# Altium PCB PCB2.PcbDoc (part 3 of 3)
Units mm, origin at the board's own origin, x right, y up, seen from the top; angles counter-clockwise.
Board outline 30 x 45 mm, 4 copper layers (L1 (SIG), L2 (GND), L3 (GND), L4 (SIG+PWR)), stack 0.602 mm thick; 68 components, 50 nets, 259 pads, 113 vias.
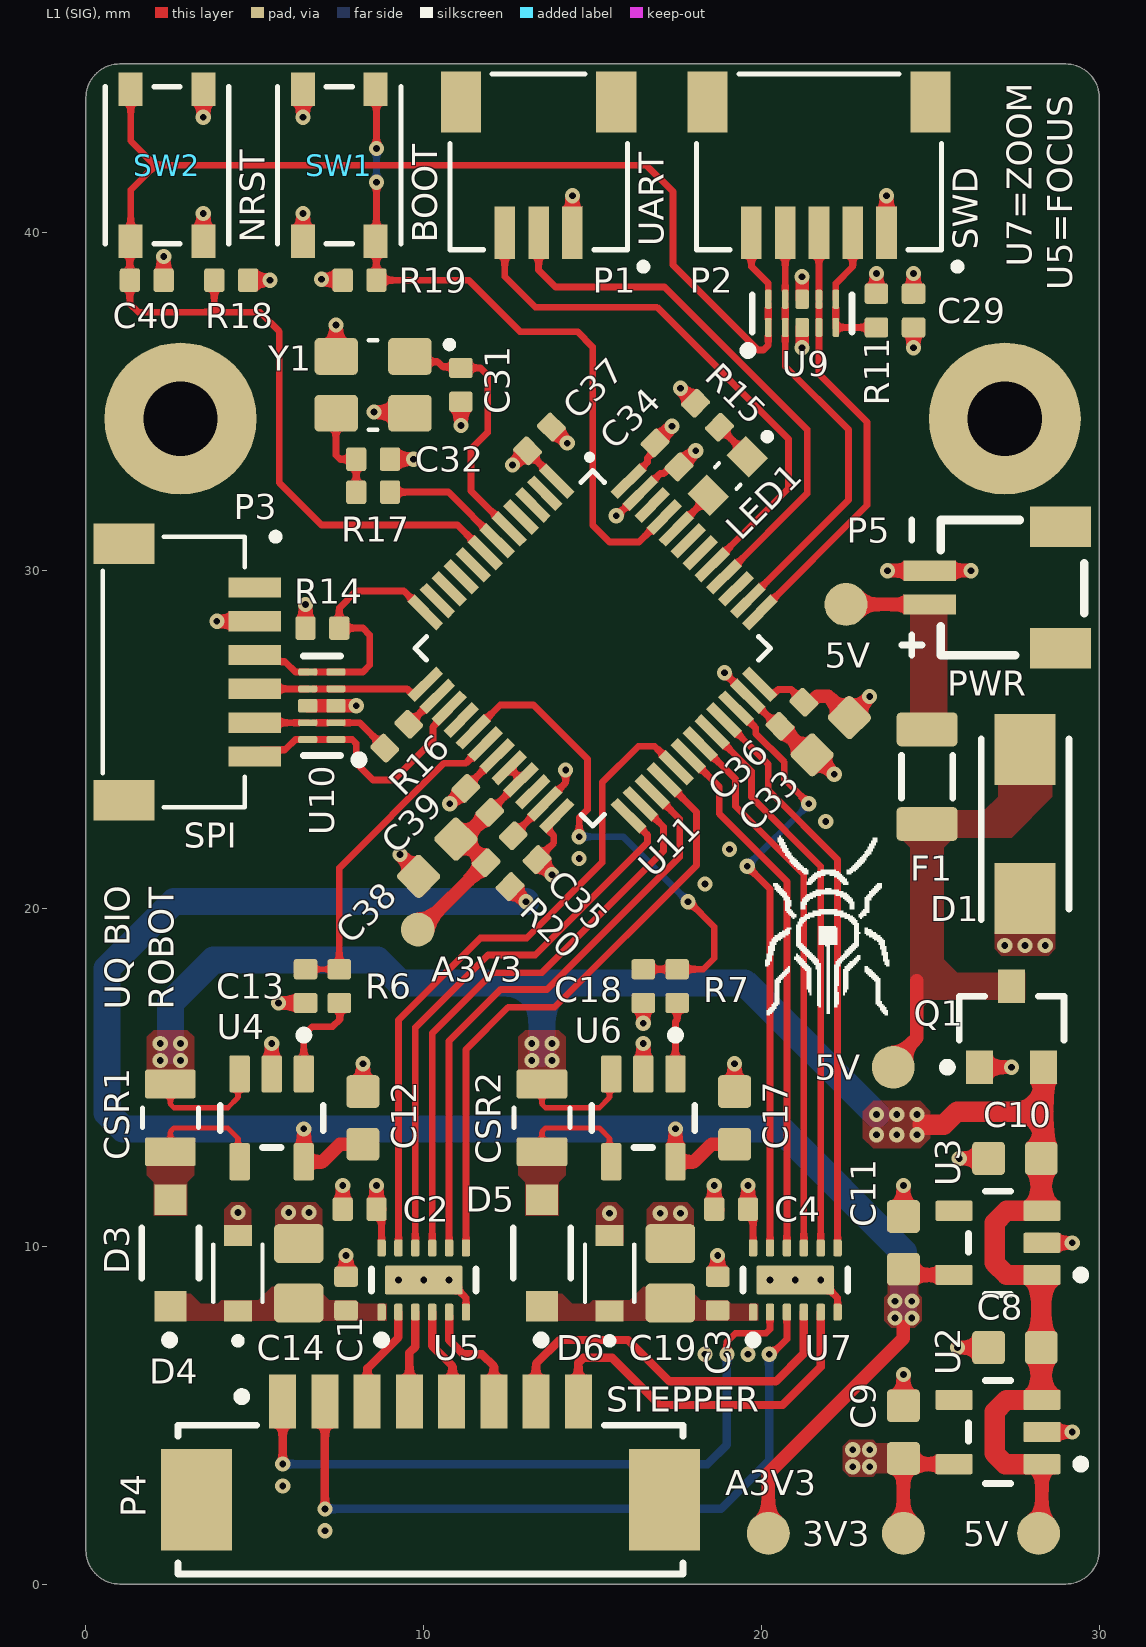
[diagram p0: L1 (SIG) view]

## Part data (continued)
SW1 SW2: library part PTS810SJM250SMTRLFS, "Switch Tactile N.O. SPST Button J-Bend 0.05A 16V 150000Cycles 1.569N SMD T/R", Case/Package=SMD/SMT, Color=Black, Contact Current Rating=50mA, Contact Resistance=500mΩ, Insulation Resistance=100MΩ, Manufacturer="C&K Components", Max Operating Temperature=85°C, Max Voltage Rating (DC)=16V, Min Operating Temperature=-40°C, Operating Force=1.57N, Actuator Length=711.2µm, Category="Tactile Switches", ComponentLink1Description=https://datasheet.octopart.com:443/PTS810SJM250SMTRLFS-C%26K-Components-datasheet-180017475.pdf?src-supplier=IHS, ComponentLink1URL=https://datasheet.octopart.com:443/PTS810SJM250SMTRLFS-C%26K-Components-datasheet-180017475.pdf?src-supplier=IHS, ComponentLink2Description=https://datasheet.octopart.com:443/PTS810SJM250SMTRLFS-C%26K-Components-datasheet-67873722.pdf?src-supplier=Upverter, ComponentLink2URL=https://datasheet.octopart.com:443/PTS810SJM250SMTRLFS-C%26K-Components-datasheet-67873722.pdf?src-supplier=Upverter, ComponentLink3Description=https://datasheet.octopart.com:443/PTS810-SJM-250-SMTR-LFS-C%26K-Components-datasheet-41562126.pdf?src-supplier=Upverter, ComponentLink3URL=https://datasheet.octopart.com:443/PTS810-SJM-250-SMTR-LFS-C%26K-Components-datasheet-41562126.pdf?src-supplier=Upverter, ComponentLink4Description=https://datasheet.octopart.com:443/PTS810SJM250SMTR-LFS-C%26K-Components-datasheet-181955281.pdf?src-supplier=Farnell, ComponentLink4URL=https://datasheet.octopart.com:443/PTS810SJM250SMTR-LFS-C%26K-Components-datasheet-181955281.pdf?src-supplier=Farnell, ComponentLink5Description=https://datasheet.octopart.com:443/PTS810SJM250SMTRLFS-C%26K-Components-datasheet-134606748.pdf?src-supplier=TME, ComponentLink5URL=https://datasheet.octopart.com:443/PTS810SJM250SMTRLFS-C%26K-Components-datasheet-134606748.pdf?src-supplier=TME, ComponentLink6Description=https://datasheet.octopart.com:443/PTS810-SJM-250-SMTR-LFS-C%26K-Components-datasheet-151508687.pdf?src-supplier=TME, ComponentLink6URL=https://datasheet.octopart.com:443/PTS810-SJM-250-SMTR-LFS-C%26K-Components-datasheet-151508687.pdf?src-supplier=TME, ComponentLink7Description=http://sigma.octopart.com:80/reach_statement/ITT-company-18.pdf?src-supplier=Compliance+Statements, ComponentLink7URL=http://sigma.octopart.com:80/reach_statement/ITT-company-18.pdf?src-supplier=Compliance+Statements, Contact Plating=Silver, Country of Origin="Mainland China", Current Rating=50mA, Depth=4.6mm, Electrical Life=150kcycles, Export Control Classification Number (ECCN) Code=EAR99, Harmonized Tariff Schedule (HTS) Code=8536.50.90.40, Height=1.8mm, Illumination Type=Non-Illuminated, Introduction Date=2013-03-04, Lead Free="Lead Free", Length=4.2mm, Life (Cycles)=150kcycles, Lifecycle Status=Production, Manufacturer Package Identifier=PTS810SJM250SMTRLFS, Manufacturer Part Number=PTS810SJM250SMTRLFS, Max Current Rating=50mA, Mechanical Life=150kcycles, Mount="Surface Mount", Number of Pins=4, Number of Positions=1, Orientation=Straight, Pricing 1="1=0.58, 10=0.501, 25=0.4672, 100=0.4173, 250=0.38652, 500=0.36488, 1000=0.34488 (USD)", REACH SVHC=Yes, RoHS=Compliant, Stock 1=70955, Supplier 1=DigiKey, Switch Function=Off-Mom, Switch Travel=150µm, Termination=Solder, Throw Configuration=SPST, Voltage Rating (DC)=16V
U2 U3: "300mA ultra-low-noise low-IQ low-dropout (LDO) linear regulator with high PSRR 5-SOT-23 -40 to 125", Case/Package=SOT-23-5, Dropout Voltage=145mV, Manufacturer="Texas Instruments", Manufacturer Lifecycle Status=ACTIVE, Max Junction Temperature (Tj)=125°C, Max Supply Voltage=6V, Min Operating Temperature=-40°C, Min Supply Voltage=1.6V, Nominal Supply Current=6.5µA, Output Current=300mA, Output Voltage=3.3V, Supplier Part Number 1=296-TPS7A2033PDBVRDKR-ND, Accuracy=1.5%, Category="LDO Voltage Regulators", ComponentLink1Description=https://sigma.octopart.com:443/177332311/technical_drawing/Texas-Instruments-TPS7A2033PDBVR.pdf?src-supplier=Texas+Instruments, ComponentLink1URL=https://sigma.octopart.com:443/177332311/technical_drawing/Texas-Instruments-TPS7A2033PDBVR.pdf?src-supplier=Texas+Instruments, ComponentLink2Description=https://octopart.com:443/opatz8j6/c1?t=jI4MJxUHNHWPLUTUjPFE_I4nFT9ogQQS70wFg6iEODFO8LbYHvqBDKPBMlDtEwO4fNGI88ubVwCkCjf0m79oYyvw0lNgXSr_kQlB_nshs-lDL0gpQEt062WpfwVbrY7aMcaNfk_VYcVu1c5ZyMHT8tYLznoJcMs0V3cIKOpV8FkTUbmZxBhaArT7MSQXB5rB175PQ9HeqkODOBcAb5uxQ4pXmdIRVFW0nHjT5bbTxbLCkHYQ6wSbjOTmjpzrmMdRq376bhW5SzS0L0ZYTijf2l1mplZ7KrrI9CUmQvcyMNcVPe6befGlNnr1fDH3Q5Ss6aSm6FD-UpaqOnEuIpR4XaVo6xK0ksEziWk1rzqOuekfSo_fNioOtoDqTgyhaxobMR58zb0N&src-supplier=Texas+Instruments, ComponentLink2URL=https://octopart.com:443/opatz8j6/c1?t=jI4MJxUHNHWPLUTUjPFE_I4nFT9ogQQS70wFg6iEODFO8LbYHvqBDKPBMlDtEwO4fNGI88ubVwCkCjf0m79oYyvw0lNgXSr_kQlB_nshs-lDL0gpQEt062WpfwVbrY7aMcaNfk_VYcVu1c5ZyMHT8tYLznoJcMs0V3cIKOpV8FkTUbmZxBhaArT7MSQXB5rB175PQ9HeqkODOBcAb5uxQ4pXmdIRVFW0nHjT5bbTxbLCkHYQ6wSbjOTmjpzrmMdRq376bhW5SzS0L0ZYTijf2l1mplZ7KrrI9CUmQvcyMNcVPe6befGlNnr1fDH3Q5Ss6aSm6FD-UpaqOnEuIpR4XaVo6xK0ksEziWk1rzqOuekfSo_fNioOtoDqTgyhaxobMR58zb0N&src-supplier=Texas+Instruments, ComponentLink3Description=https://sigma.octopart.com:443/175570406/technical_drawing/Texas-Instruments-TPS7A2033PDBVR.pdf?src-supplier=Texas+Instruments, ComponentLink3URL=https://sigma.octopart.com:443/175570406/technical_drawing/Texas-Instruments-TPS7A2033PDBVR.pdf?src-supplier=Texas+Instruments, ComponentLink4Description=https://sigma.octopart.com:443/169406034/technical_drawing/Texas-Instruments-TPS7A2033PDBVR.pdf?src-supplier=Texas+Instruments, ComponentLink4URL=https://sigma.octopart.com:443/169406034/technical_drawing/Texas-Instruments-TPS7A2033PDBVR.pdf?src-supplier=Texas+Instruments, ComponentLink5Description=https://sigma.octopart.com:443/155939316/technical_drawing/Texas-Instruments-TPS7A2033PDBVR.pdf?src-supplier=Texas+Instruments, ComponentLink5URL=https://sigma.octopart.com:443/155939316/technical_drawing/Texas-Instruments-TPS7A2033PDBVR.pdf?src-supplier=Texas+Instruments, ComponentLink6Description=https://datasheet.octopart.com:443/TPS7A2033PDBVR-Texas-Instruments-datasheet-149070019.pdf?src-supplier=Upverter, ComponentLink6URL=https://datasheet.octopart.com:443/TPS7A2033PDBVR-Texas-Instruments-datasheet-149070019.pdf?src-supplier=Upverter, ComponentLink7Description=https://datasheet.octopart.com:443/TPS7A2033PDBVR-Texas-Instruments-datasheet-164420832.pdf?src-supplier=Augswan, ComponentLink7URL=https://datasheet.octopart.com:443/TPS7A2033PDBVR-Texas-Instruments-datasheet-164420832.pdf?src-supplier=Augswan, ComponentLink8Description=https://datasheet.octopart.com:443/TPS7A2033PDBVR-Texas-Instruments-datasheet-159781690.pdf?src-supplier=LCSC, ComponentLink8URL=https://datasheet.octopart.com:443/TPS7A2033PDBVR-Texas-Instruments-datasheet-159781690.pdf?src-supplier=LCSC, ComponentLink9Description=http://sigma.octopart.com:80/reach_statement/Texas-Instruments-company-64.pdf?src-supplier=Compliance+Statements, ComponentLink9URL=http://sigma.octopart.com:80/reach_statement/Texas-Instruments-company-64.pdf?src-supplier=Compliance+Statements, ComponentLink10Description=http://sigma.octopart.com:80/conflict_mineral_statement/Texas-Instruments-company-63.pdf?src-supplier=Compliance+Statements, ComponentLink10URL=http://sigma.octopart.com:80/conflict_mineral_statement/Texas-Instruments-company-63.pdf?src-supplier=Compliance+Statements, Height=1.45mm, Length=2.9mm, Lifecycle Status=Production, Manufacturer Part Number=TPS7A2033PDBVR, Max Operating Temperature=125°C, Number of Channels=1, Number of Outputs=1, Number of Pins=5, Pricing 1="1=0.33, 10=0.225, 25=0.1992, 100=0.1715, 250=0.15828, 500=0.15028, 1000=0.14369 (USD)", RoHS=Compliant, Stock 1=57995, Supplier 1=DigiKey, Thickness=1.2mm, Width=1.6mm
U4 U6: "ROHS3Compliant e3 INA180 Matte Tin (Sn) op amp amplifier circuit 2.9mm 80muA 26V 350kHz", Ambient Temperature Range High=125°C, Case/Package=SOT-23, Input Bias Current=80µA, Input Offset Voltage (Vos)=100µV, Manufacturer="Texas Instruments", Manufacturer Lifecycle Status=ACTIVE, Max Junction Temperature (Tj)=150°C, Max Supply Voltage=5.5V, Min Operating Temperature=-40°C, Min Supply Voltage=2.7V, Nominal Supply Current=197µA, Supplier Part Number 1=296-47652-1-ND, Bandwidth=350kHz, Category="Amplifiers - Op Amps, Buffer, Instrumentation", ComponentLink1Description=https://sigma.octopart.com:443/177332311/technical_drawing/Texas-Instruments-INA180A1IDBVR.pdf?src-supplier=Texas+Instruments, ComponentLink1URL=https://sigma.octopart.com:443/177332311/technical_drawing/Texas-Instruments-INA180A1IDBVR.pdf?src-supplier=Texas+Instruments, ComponentLink2Description=https://octopart.com:443/opatz8j6/c1?t=USVpXwc3pIVbTVy8h6XuDkkoMGvkb5KD_FqeyE2PNCczB7YTe3Q13Z_T8ujtTn4Gpso-l7jh3l6VtA3vP-Hgq8a9n1cfIPRG-tpgt9UBcaQl0MK5o67hqvQcTaIDIYwSl7JEugdJq0jtVggrhuFBiiJJDgLUBw7G871SvT8UFaWvLuMV28-GBXdYGtfIxjjOnSlCpVbhUW_om3c_pXV3PX12KrIhnnIeCDjhaOM72OKUehH2shrJDmyrmRFLZA1ON-kpg-xfMekIeTPTZvu1kdk-ipxY04WCEpSq6AhyvyePoREOm4PqxzgZUX-SXQfHeLMqAZ0U-EEJvwubD6Cq1rmkHs9VIc9CN0w7gj8JD984MXRoqBAxtRGhZEIaf43rCiTHWg&src-supplier=Texas+Instruments, ComponentLink2URL=https://octopart.com:443/opatz8j6/c1?t=USVpXwc3pIVbTVy8h6XuDkkoMGvkb5KD_FqeyE2PNCczB7YTe3Q13Z_T8ujtTn4Gpso-l7jh3l6VtA3vP-Hgq8a9n1cfIPRG-tpgt9UBcaQl0MK5o67hqvQcTaIDIYwSl7JEugdJq0jtVggrhuFBiiJJDgLUBw7G871SvT8UFaWvLuMV28-GBXdYGtfIxjjOnSlCpVbhUW_om3c_pXV3PX12KrIhnnIeCDjhaOM72OKUehH2shrJDmyrmRFLZA1ON-kpg-xfMekIeTPTZvu1kdk-ipxY04WCEpSq6AhyvyePoREOm4PqxzgZUX-SXQfHeLMqAZ0U-EEJvwubD6Cq1rmkHs9VIc9CN0w7gj8JD984MXRoqBAxtRGhZEIaf43rCiTHWg&src-supplier=Texas+Instruments, ComponentLink3Description=https://sigma.octopart.com:443/175570406/technical_drawing/Texas-Instruments-INA180A1IDBVR.pdf?src-supplier=Texas+Instruments, ComponentLink3URL=https://sigma.octopart.com:443/175570406/technical_drawing/Texas-Instruments-INA180A1IDBVR.pdf?src-supplier=Texas+Instruments, ComponentLink4Description=https://sigma.octopart.com:443/169406034/technical_drawing/Texas-Instruments-INA180A1IDBVR.pdf?src-supplier=Texas+Instruments, ComponentLink4URL=https://sigma.octopart.com:443/169406034/technical_drawing/Texas-Instruments-INA180A1IDBVR.pdf?src-supplier=Texas+Instruments, ComponentLink5Description=https://sigma.octopart.com:443/155939316/technical_drawing/Texas-Instruments-INA180A1IDBVR.pdf?src-supplier=Texas+Instruments, ComponentLink5URL=https://sigma.octopart.com:443/155939316/technical_drawing/Texas-Instruments-INA180A1IDBVR.pdf?src-supplier=Texas+Instruments, ComponentLink6Description=https://sigma.octopart.com:443/102331370/technical_drawing/Texas-Instruments-INA180A1IDBVR.pdf?src-supplier=Texas+Instruments, ComponentLink6URL=https://sigma.octopart.com:443/102331370/technical_drawing/Texas-Instruments-INA180A1IDBVR.pdf?src-supplier=Texas+Instruments, ComponentLink7Description=https://sigma.octopart.com:443/49249325/technical_drawing/Texas-Instruments-INA180A1IDBVR.pdf?src-supplier=Texas+Instruments, ComponentLink7URL=https://sigma.octopart.com:443/49249325/technical_drawing/Texas-Instruments-INA180A1IDBVR.pdf?src-supplier=Texas+Instruments, ComponentLink8Description=https://datasheet.octopart.com:443/INA180A1IDBVR-Texas-Instruments-datasheet-147835637.pdf?src-supplier=SHENGYU+ELECTRONICS, ComponentLink8URL=https://datasheet.octopart.com:443/INA180A1IDBVR-Texas-Instruments-datasheet-147835637.pdf?src-supplier=SHENGYU+ELECTRONICS, ComponentLink9Description=https://datasheet.octopart.com:443/INA180A1IDBVR-Texas-Instruments-datasheet-159598194.pdf?src-supplier=LCSC, ComponentLink9URL=https://datasheet.octopart.com:443/INA180A1IDBVR-Texas-Instruments-datasheet-159598194.pdf?src-supplier=LCSC, ComponentLink10Description=https://datasheet.octopart.com:443/INA180A1IDBVR-Texas-Instruments-datasheet-159115053.pdf?src-supplier=LCSC, ComponentLink10URL=https://datasheet.octopart.com:443/INA180A1IDBVR-Texas-Instruments-datasheet-159115053.pdf?src-supplier=LCSC, ComponentLink11Description=http://sigma.octopart.com:80/reach_statement/Texas-Instruments-company-64.pdf?src-supplier=Compliance+Statements, ComponentLink11URL=http://sigma.octopart.com:80/reach_statement/Texas-Instruments-company-64.pdf?src-supplier=Compliance+Statements, ComponentLink12Description=http://sigma.octopart.com:80/conflict_mineral_statement/Texas-Instruments-company-63.pdf?src-supplier=Compliance+Statements, ComponentLink12URL=http://sigma.octopart.com:80/conflict_mineral_statement/Texas-Instruments-company-63.pdf?src-supplier=Compliance+Statements, Height=1.45mm, Length=2.9mm, Lifecycle Status=Production, Manufacturer Part Number=INA180A1IDBVR, Max Operating Temperature=125°C, Number of Channels=1, Number of Pins=5, Pricing 1="1=0.52, 10=0.363, 25=0.324, 100=0.2815, 250=0.26124, 500=0.24904, 1000=0.23899 (USD)", RoHS=Compliant, Schedule B="8542330000, 8542330000|8542330000|8542330000|8542330000|8542330000", Supplier 1=DigiKey, Thickness=1.2mm, Width=1.6mm
U5 U7: "12-V, 1.5-A dual H-bridge motor driver 12-WSON -40 to 85", Collector Emitter Voltage (VCEO)=11V, Drain to Source Resistance=305mΩ, Manufacturer="Texas Instruments", Manufacturer Lifecycle Status=ACTIVE, Max Collector Current=1.5A, Max Junction Temperature (Tj)=150°C, Max Operating Temperature=85°C, Max Supply Voltage=7V, Min Operating Temperature=-40°C, Min Supply Voltage=2V, Nominal Supply Current=450µA, Supplier Part Number 1=296-30391-1-ND, Switching Frequency=250kHz, Category="Motor Drivers", ComponentLink1Description=https://sigma.octopart.com:443/81678663/technical_drawing/Texas-Instruments-DRV8835DSSR.pdf?src-supplier=Texas+Instruments, ComponentLink1URL=https://sigma.octopart.com:443/81678663/technical_drawing/Texas-Instruments-DRV8835DSSR.pdf?src-supplier=Texas+Instruments, ComponentLink2Description=https://octopart.com:443/opatz8j6/c1?t=yYKeYF_qTZgJqykfbkIe-MyNo-awpiDwQJ1JpZHc4QQmRE2ALxlPI2F5HuxbvxDQJgOwt9AujW2Z3abA8YObzfh8IObdK5EIxXvX-S8nfL3vF03rQCSr4IhvPx36lTDUzRho3FSTerecEi6PUwZQAcfw4biX9dfhX4qJFG4-DvkdYyzF_AXHfcrjW8NYqjtFm1Ig3y5pJIb4XtmcjhG94Ou3GqVr8sF3hx5Ni2mUq8MJhRMvjbwS2P2fKQOZ0GhDVzPGf3Gk655UHMKd4eaVKvQsspbWj7NAZfnUy6KTI0iGS1VjwsOnAAAnyZzeHo6qjg_9VUaOVsM5A2TuwDIAEEDLISKE6EaKfj0-xcuZ4_eWrZcxUU_9i-up4dsoawxXY1pm7Q&src-supplier=Texas+Instruments, ComponentLink2URL=https://octopart.com:443/opatz8j6/c1?t=yYKeYF_qTZgJqykfbkIe-MyNo-awpiDwQJ1JpZHc4QQmRE2ALxlPI2F5HuxbvxDQJgOwt9AujW2Z3abA8YObzfh8IObdK5EIxXvX-S8nfL3vF03rQCSr4IhvPx36lTDUzRho3FSTerecEi6PUwZQAcfw4biX9dfhX4qJFG4-DvkdYyzF_AXHfcrjW8NYqjtFm1Ig3y5pJIb4XtmcjhG94Ou3GqVr8sF3hx5Ni2mUq8MJhRMvjbwS2P2fKQOZ0GhDVzPGf3Gk655UHMKd4eaVKvQsspbWj7NAZfnUy6KTI0iGS1VjwsOnAAAnyZzeHo6qjg_9VUaOVsM5A2TuwDIAEEDLISKE6EaKfj0-xcuZ4_eWrZcxUU_9i-up4dsoawxXY1pm7Q&src-supplier=Texas+Instruments, ComponentLink3Description=https://datasheet.octopart.com:443/DRV8835DSSR-Texas-Instruments-datasheet-15896035.pdf?src-supplier=Texas+Instruments, ComponentLink3URL=https://datasheet.octopart.com:443/DRV8835DSSR-Texas-Instruments-datasheet-15896035.pdf?src-supplier=Texas+Instruments, ComponentLink4Description=https://datasheet.octopart.com:443/DRV8835DSSR-Texas-Instruments-datasheet-10948952.pdf?src-supplier=Texas+Instruments, ComponentLink4URL=https://datasheet.octopart.com:443/DRV8835DSSR-Texas-Instruments-datasheet-10948952.pdf?src-supplier=Texas+Instruments, ComponentLink5Description=https://sigma.octopart.com:443/49250719/technical_drawing/Texas-Instruments-DRV8835DSSR.pdf?src-supplier=Texas+Instruments, ComponentLink5URL=https://sigma.octopart.com:443/49250719/technical_drawing/Texas-Instruments-DRV8835DSSR.pdf?src-supplier=Texas+Instruments, ComponentLink6Description=https://datasheet.octopart.com:443/DRV8835DSSR-Texas-Instruments-datasheet-21773231.pdf?src-supplier=element14+APAC, ComponentLink6URL=https://datasheet.octopart.com:443/DRV8835DSSR-Texas-Instruments-datasheet-21773231.pdf?src-supplier=element14+APAC, ComponentLink7Description=https://datasheet.octopart.com:443/DRV8835DSSR-Texas-Instruments-datasheet-17762361.pdf?src-supplier=element14+APAC, ComponentLink7URL=https://datasheet.octopart.com:443/DRV8835DSSR-Texas-Instruments-datasheet-17762361.pdf?src-supplier=element14+APAC, ComponentLink8Description=https://datasheet.octopart.com:443/DRV8835DSSR-Texas-Instruments-datasheet-11523579.pdf?src-supplier=Upverter, ComponentLink8URL=https://datasheet.octopart.com:443/DRV8835DSSR-Texas-Instruments-datasheet-11523579.pdf?src-supplier=Upverter, ComponentLink9Description=https://datasheet.octopart.com:443/DRV8835DSSR-Texas-Instruments-datasheet-102488860.pdf?src-supplier=Farnell, ComponentLink9URL=https://datasheet.octopart.com:443/DRV8835DSSR-Texas-Instruments-datasheet-102488860.pdf?src-supplier=Farnell, ComponentLink10Description=https://datasheet.octopart.com:443/DRV8835DSSR-Texas-Instruments-datasheet-165803887.pdf?src-supplier=LCSC, ComponentLink10URL=https://datasheet.octopart.com:443/DRV8835DSSR-Texas-Instruments-datasheet-165803887.pdf?src-supplier=LCSC, ComponentLink11Description=https://datasheet.octopart.com:443/DRV8835DSSR-Texas-Instruments-datasheet-159606066.pdf?src-supplier=LCSC, ComponentLink11URL=https://datasheet.octopart.com:443/DRV8835DSSR-Texas-Instruments-datasheet-159606066.pdf?src-supplier=LCSC, ComponentLink12Description=https://datasheet.octopart.com:443/DRV8835DSSR-Texas-Instruments-datasheet-164414299.pdf?src-supplier=SHENGYU+ELECTRONICS, ComponentLink12URL=https://datasheet.octopart.com:443/DRV8835DSSR-Texas-Instruments-datasheet-164414299.pdf?src-supplier=SHENGYU+ELECTRONICS, ComponentLink13Description=https://datasheet.octopart.com:443/DRV8835DSSR-Texas-Instruments-datasheet-62346020.pdf?src-supplier=Newark, ComponentLink13URL=https://datasheet.octopart.com:443/DRV8835DSSR-Texas-Instruments-datasheet-62346020.pdf?src-supplier=Newark, ComponentLink14Description=https://datasheet.octopart.com:443/DRV8835DSSR-Texas-Instruments-datasheet-179109355.pdf?src-supplier=Arrow.cn, ComponentLink14URL=https://datasheet.octopart.com:443/DRV8835DSSR-Texas-Instruments-datasheet-179109355.pdf?src-supplier=Arrow.cn, ComponentLink15Description=http://sigma.octopart.com:80/reach_statement/Texas-Instruments-company-64.pdf?src-supplier=Compliance+Statements, ComponentLink15URL=http://sigma.octopart.com:80/reach_statement/Texas-Instruments-company-64.pdf?src-supplier=Compliance+Statements, ComponentLink16Description=http://sigma.octopart.com:80/conflict_mineral_statement/Texas-Instruments-company-63.pdf?src-supplier=Compliance+Statements, ComponentLink16URL=http://sigma.octopart.com:80/conflict_mineral_statement/Texas-Instruments-company-63.pdf?src-supplier=Compliance+Statements, Height=800µm, Interface=Parallel, Lead Free="Lead Free", Length=2mm, Lifecycle Status=Production, Logic Function=AND, Manufacturer Part Number=DRV8835DSSR, Motor Type=Brushed, Mount="Surface Mount", Number of Outputs=2, Number of Pins=12, Operating Supply Current=1.5A, Output Current=1.5A, Output Voltage=11V, Packaging="Cut Tape", Pricing 1="1=2.19, 10=1.619, 25=1.476, 100=1.3189, 250=1.24396, 500=1.20412 (USD)", Radiation Hardening=No, REACH SVHC=No, RoHS=Compliant, Schedule B="8542390000, 8542390000|8542390000|8542390000|8542390000|8542390000", Stock 1=49571, Supplier 1=DigiKey, Thickness=750µm, Width=3mm
U9 U10: "Tvs Diodes & Esd Suppressors; TPD4E02B04DQAR; Texas Instruments; 3.6 V; 8.8 V; 5.5 V; 6.4 V", Ambient Temperature Range High=125°C, Breakdown Voltage=6.4V, Capacitance=250fF, Clamping Voltage=8.8V, Manufacturer="Texas Instruments", Manufacturer Lifecycle Status=ACTIVE, Min Breakdown Voltage=5.5V, Min Operating Temperature=-40°C, Operating Supply Voltage=3.6V, Peak Pulse Current=2A, Peak Pulse Power=17W, Power Line Protection=No, Supplier Part Number 1=296-43875-1-ND, Category="TVS Diodes", ComponentLink1Description=https://sigma.octopart.com:443/176143083/technical_drawing/Texas-Instruments-TPD4E02B04DQAR.pdf?src-supplier=Texas+Instruments, ComponentLink1URL=https://sigma.octopart.com:443/176143083/technical_drawing/Texas-Instruments-TPD4E02B04DQAR.pdf?src-supplier=Texas+Instruments, ComponentLink2Description=https://octopart.com:443/opatz8j6/c1?t=aoqDSauUwmHle6qTDBhf01J_x3kMb2tNsy6DVVQxBhwMOFfKV8CkZQkeAg7HStYnhO7loO6NCnDu1YOrv9Z2JQczVlylZGWUOsI57_uevt2i4KjUmUJImJtsNsM8TsbJCJLZRzl3c-JHBOFgKjYzm3f4YkU-aqx3v6cxb1C_ME88aw5ttupZPGMLTNgyHtBJBcpA7ouznK1IKJV2UmyETiVI1pi24i54odCN60WXcAZMQqZ4PrsOmgAalftpno53H2KnyzLpeqa1D7K90IVfQHoOcpwRK6PpTcRmz9oJErDp9YFCGvc7QJo0rve7mXR72TJL87rmV4JS1nvPfqc5mZqgKm5dyfH3wfm-8AMgzoYYSqgqwA0y9g-vb7wUQDN8CkBv7YuzpFQ&src-supplier=Texas+Instruments, ComponentLink2URL=https://octopart.com:443/opatz8j6/c1?t=aoqDSauUwmHle6qTDBhf01J_x3kMb2tNsy6DVVQxBhwMOFfKV8CkZQkeAg7HStYnhO7loO6NCnDu1YOrv9Z2JQczVlylZGWUOsI57_uevt2i4KjUmUJImJtsNsM8TsbJCJLZRzl3c-JHBOFgKjYzm3f4YkU-aqx3v6cxb1C_ME88aw5ttupZPGMLTNgyHtBJBcpA7ouznK1IKJV2UmyETiVI1pi24i54odCN60WXcAZMQqZ4PrsOmgAalftpno53H2KnyzLpeqa1D7K90IVfQHoOcpwRK6PpTcRmz9oJErDp9YFCGvc7QJo0rve7mXR72TJL87rmV4JS1nvPfqc5mZqgKm5dyfH3wfm-8AMgzoYYSqgqwA0y9g-vb7wUQDN8CkBv7YuzpFQ&src-supplier=Texas+Instruments, ComponentLink3Description=https://datasheet.octopart.com:443/TPD4E02B04DQAR-Texas-Instruments-datasheet-59814757.pdf?src-supplier=Texas+Instruments, ComponentLink3URL=https://datasheet.octopart.com:443/TPD4E02B04DQAR-Texas-Instruments-datasheet-59814757.pdf?src-supplier=Texas+Instruments, ComponentLink4Description=https://sigma.octopart.com:443/49262242/technical_drawing/Texas-Instruments-TPD4E02B04DQAR.pdf?src-supplier=Texas+Instruments, ComponentLink4URL=https://sigma.octopart.com:443/49262242/technical_drawing/Texas-Instruments-TPD4E02B04DQAR.pdf?src-supplier=Texas+Instruments, ComponentLink5Description=https://datasheet.octopart.com:443/TPD4E02B04DQAR-Texas-Instruments-datasheet-95279696.pdf?src-supplier=Upverter, ComponentLink5URL=https://datasheet.octopart.com:443/TPD4E02B04DQAR-Texas-Instruments-datasheet-95279696.pdf?src-supplier=Upverter, ComponentLink6Description=https://datasheet.octopart.com:443/TPD4E02B04DQAR-Texas-Instruments-datasheet-66617599.pdf?src-supplier=element14+APAC, ComponentLink6URL=https://datasheet.octopart.com:443/TPD4E02B04DQAR-Texas-Instruments-datasheet-66617599.pdf?src-supplier=element14+APAC, ComponentLink7Description=https://datasheet.octopart.com:443/TPD4E02B04DQAR-Texas-Instruments-datasheet-62283090.pdf?src-supplier=Newark, ComponentLink7URL=https://datasheet.octopart.com:443/TPD4E02B04DQAR-Texas-Instruments-datasheet-62283090.pdf?src-supplier=Newark, ComponentLink8Description=https://datasheet.octopart.com:443/TPD4E02B04DQAR-Texas-Instruments-datasheet-164419877.pdf?src-supplier=Augswan, ComponentLink8URL=https://datasheet.octopart.com:443/TPD4E02B04DQAR-Texas-Instruments-datasheet-164419877.pdf?src-supplier=Augswan, ComponentLink9Description=https://datasheet.octopart.com:443/TPD4E02B04DQAR-Texas-Instruments-datasheet-159117911.pdf?src-supplier=LCSC, ComponentLink9URL=https://datasheet.octopart.com:443/TPD4E02B04DQAR-Texas-Instruments-datasheet-159117911.pdf?src-supplier=LCSC, ComponentLink10Description=https://datasheet.octopart.com:443/TPD4E02B04DQAR-Texas-Instruments-datasheet-164847889.pdf?src-supplier=Arrow.cn, ComponentLink10URL=https://datasheet.octopart.com:443/TPD4E02B04DQAR-Texas-Instruments-datasheet-164847889.pdf?src-supplier=Arrow.cn, ComponentLink11Description=https://datasheet.octopart.com:443/TPD4E02B04DQAR-Texas-Instruments-datasheet-137316104.pdf?src-supplier=Future+Electronics, ComponentLink11URL=https://datasheet.octopart.com:443/TPD4E02B04DQAR-Texas-Instruments-datasheet-137316104.pdf?src-supplier=Future+Electronics, ComponentLink12Description=http://sigma.octopart.com:80/reach_statement/Texas-Instruments-company-64.pdf?src-supplier=Compliance+Statements, ComponentLink12URL=http://sigma.octopart.com:80/reach_statement/Texas-Instruments-company-64.pdf?src-supplier=Compliance+Statements, ComponentLink13Description=http://sigma.octopart.com:80/conflict_mineral_statement/Texas-Instruments-company-63.pdf?src-supplier=Compliance+Statements, ComponentLink13URL=http://sigma.octopart.com:80/conflict_mineral_statement/Texas-Instruments-company-63.pdf?src-supplier=Compliance+Statements, Composition=Zener, Direction=Bidirectional, Height=550µm, Interface=Ethernet, Lead Free="Lead Free", Length=2.5mm, Lifecycle Status=Production, Manufacturer Part Number=TPD4E02B04DQAR, Max Operating Temperature=125°C, Mount="Surface Mount", Number of Bidirectional Channels=4, Number of Channels=4, Number of Pins=10, Packaging="Cut Tape", Pricing 1="1=1.11, 10=0.694, 100=0.4535, 500=0.34992, 1000=0.31655 (USD)", REACH SVHC=No, Reverse Standoff Voltage=3.6V, RoHS=Compliant, Schedule B="8541100080, 8541100080|8541100080|8541100080|8541100080|8541100080", Stock 1=7356, Supplier 1=DigiKey, Thickness=500µm, Width=1mm
U11: "Microcontroller 32-Bit ARM Cortex-M4 RISC 32K-Byte Flash 3.3V 48-Pin LQFP", Case/Package=LFQFP, Frequency=170MHz, Manufacturer=STMicroelectronics, Max Frequency=48MHz, Max Operating Temperature=85°C, Max Supply Current=29mA, Max Supply Voltage=3.6V, Min Operating Temperature=-40°C, Min Supply Voltage=1.71V, Nominal Supply Voltage (DC)=3V, ADC Channels (Resolution)="17-Ch 12-Bit", Category=Microcontrollers, China RoHS=Compliant, ComponentLink1Description=https://datasheet.octopart.com:443/STM32G431C6T6-STMicroelectronics-datasheet-159144895.pdf?src-supplier=Newark, ComponentLink1URL=https://datasheet.octopart.com:443/STM32G431C6T6-STMicroelectronics-datasheet-159144895.pdf?src-supplier=Newark, ComponentLink2Description=https://datasheet.octopart.com:443/STM32G431C6T6-STMicroelectronics-datasheet-144618855.pdf?src-supplier=TME, ComponentLink2URL=https://datasheet.octopart.com:443/STM32G431C6T6-STMicroelectronics-datasheet-144618855.pdf?src-supplier=TME, Core Architecture="ARM Cortex-M4", Country of Origin="Mainland China, Taiwan", DAC Channels (Resolution)="4-Ch 12-Bit", EEPROM Memory Size=0B, Export Control Classification Number (ECCN) Code=3A991.A.2, Flash Memory Size=32kB, Harmonized Tariff Schedule (HTS) Code=8542.31.00.25, Height - Seated (Max)=1.6mm, Interface=USB, Introduction Date=2019-10-29, Length=7mm, Lifecycle Status=Production, Manufacturer Part Number=STM32G431C6T6, Memory Type=FLASH, Number of A/D Converters=2, Number of Channels=17, Number of D/A Converters=2, Number of I2C Channels=3, Number of I/Os=5, Number of Interrupts=16, Number of SPI Channels=3, Number of Terminals=48, Number of Timers/Counters=12, Number of USART Channels=3, Peripherals=POR, Pricing 1="1500=2.29 (USD)", RAM Size=32kB, REACH SVHC=Yes, RoHS=Compliant, Schedule B="8542310000, 8542310000|8542310000|8542310000|8542310000|8542310000", Stock 1=1500, Supplier 1="Future Electronics", Supplier Part Number 1=STM32G431C6T6, Terminal Pitch=500µm, Width=7mm
Y1: library part "TSX-3225 24.0000MF15X-AC3", "Crystal 24MHz ±10ppm (Tol) ±15ppm (Stability) 9pF FUND 40Ohm 4-Pin Mini-CSMD T/R", Case/Package=SMD/SMT, ESR (Equivalent Series Resistance)=40Ω, Frequency=24MHz, Frequency Stability=15ppm, Frequency Tolerance=0.001%, Load Capacitance=9pF, Manufacturer=Epson, Max Operating Temperature=85°C, Min Operating Temperature=-40°C, Category=Crystals, China RoHS=Compliant, ComponentLink1Description=https://datasheet.octopart.com:443/TSX-3225-24.0000MF15X-AC3-Epson-datasheet-61114919.pdf?src-supplier=ODG+(Origin+Data+Global), ComponentLink1URL=https://datasheet.octopart.com:443/TSX-3225-24.0000MF15X-AC3-Epson-datasheet-61114919.pdf?src-supplier=ODG+(Origin+Data+Global), ComponentLink2Description=https://datasheet.octopart.com:443/TSX-322524.0000MF15X-AC3-Epson-datasheet-180707711.pdf?src-supplier=IHS, ComponentLink2URL=https://datasheet.octopart.com:443/TSX-322524.0000MF15X-AC3-Epson-datasheet-180707711.pdf?src-supplier=IHS, ComponentLink3Description=https://datasheet.octopart.com:443/TSX-3225-24.0000MF15X-AC3-Epson-datasheet-141944207.pdf?src-supplier=Arrow.cn, ComponentLink3URL=https://datasheet.octopart.com:443/TSX-3225-24.0000MF15X-AC3-Epson-datasheet-141944207.pdf?src-supplier=Arrow.cn, ComponentLink4Description=http://sigma.octopart.com:80/149135495/reach_statement/Epson-TSX-3225-24.0000MF15X-AC3.pdf?src-supplier=Compliance+Statements, ComponentLink4URL=http://sigma.octopart.com:80/149135495/reach_statement/Epson-TSX-3225-24.0000MF15X-AC3.pdf?src-supplier=Compliance+Statements, ComponentLink5Description=http://sigma.octopart.com:80/149135496/rohs_statement/Epson-TSX-3225-24.0000MF15X-AC3.pdf?src-supplier=Compliance+Statements, ComponentLink5URL=http://sigma.octopart.com:80/149135496/rohs_statement/Epson-TSX-3225-24.0000MF15X-AC3.pdf?src-supplier=Compliance+Statements, Height=609.6µm, Lead Free="Lead Free", Length=3.2004mm, Lifecycle Status=Production, Manufacturer Part Number="TSX-3225 24.0000MF15X-AC3", Mount="Surface Mount", Pricing 1="1=0.82, 10=0.714, 25=0.6748, 50=0.647, 100=0.6202 (USD)", REACH SVHC=Yes, RoHS=Compliant, Schedule B="8541600060, 8541600060|8541600060|8541600060|8541600060|8541600060", Series Resistance=40Ω, Stock 1=44842, Supplier 1=DigiKey, Termination=SMD/SMT, Tolerance=0.001%, Weight=15.989131mg, Width=2.4892mm

## Free pads (board coordinates)
  round 4.5 hole 2.2 mask+0.051: 1(2.8,34.5)
  round 4.5 hole 2.2: 2(27.2,34.5)

## Via types
v1: diameter 0.45, hole 0.2, L1 (SIG) to L4 (SIG+PWR), tented both sides, 107 vias
v2: diameter 0.5, hole 0.2, L1 (SIG) to L4 (SIG+PWR), tented bottom, 6 vias

## Nets (pads, with @x,y where several pads share a name; then routed paths per layer and width w, separated by ;. In a path a pad name is that pad's centre, name@x,y a point inside that pad or via, vN(x,y) a via of type N, cw(c..) or ccw(c..) an arc to the next point about the centre after c; other vN are vias at no path point)
+3V3: 3V3.1 C2.2 C4.2 C9.2 C29.2 C33.2 C34.2 C35.2 C36.2 C37.2 R11.1 R14.1 R18.2 SW1.1 SW1.2 U2.5 U5.12 U7.12 U11.1 U11.24 U11.36 U11.48 | length 22.4
  L1 (SIG) w0.2: C2.2@8.7,11.1 8.75,11.05 U5.12 ; C37.2@13.059,33.546 C37.2 13.071,33.532 13.8,32.803 13.8,32.8 13.939,32.661 U11.1 ; C35.2 13.85,21.943 13.85,22.15 13.632,22.368 13.632,22.443 U11.24 ; U11.48 16.623,33.212 16.623,33.333 16.846,33.556 C34.2 C34.2@16.85,33.779 ; v1@17.346,34.275 v1(17.35,34.275) ; C4.2@19.7,11.1 19.75,11.05 U7.12 ; U11.36 20.264,26.325 20.338,26.325 20.494,26.481 20.877,26.481 C36.2
  L1 (SIG) w0.4: R18.2 v1(5.45,38.6) ; SW1.1 v1(6.425,40.575) ; v1(6.425,43.425) 6.425,44.125 6.5,44.2 6.45,44.25 SW1.2 ; R14.1 v1(6.5,29) ; v1(8.6,11.8) 8.6,11.2 C2.2@8.7,11.1 ; v1(12.625,33.125) 12.638,33.125 C37.2@13.059,33.546 ; C35.2 v1(13.8,21) ; C34.2@16.85,33.779 v1@17.346,34.275 ; v1(19.6,11.8) 19.6,11.2 C4.2@19.7,11.1 ; C36.2 21.289,26.068 21.43,26.068 21.642,26.28 21.973,26.28 C33.2 22.602,25.664 23.2,26.263 v1(23.2,26.275) ; R11.1 v1(23.4,38.8) ; 3V3.1 C9.2@24.2,3.55 ; C9.2 24.37,3.55 U2.5 ; C29.2 24.5,38.3 v1(24.5,38.8)
  other v1: 22.7,3.475 23.2,3.475 22.7,3.975 23.2,3.975
+5V: 5V.1@28.2,1.5 C8.2 C10.2 CSR1.2 CSR2.2 Q1.S U2.1 U2.3 U3.1 U3.3 U4.3 U6.3 | length 56.2
  L1 (SIG) w0.15: CSR1.2 2.5,14.2 2.6,14.1 4.2,14.1 4.5,14.4 U4.3@4.5,15.1 ; CSR2.2@13.5,14.8 13.5,14.2 13.6,14.1 15.2,14.1 15.5,14.4 U6.3@15.5,15.1 ; U3.1@28.28,9.13 U3.1
  L1 (SIG) w0.4: 5V.1@28.2,1.5 28.3,1.6 U2.1
  L1 (SIG) w0.6: 24.772,13.6 25.4,13.6 25.785,13.985 28.35,13.985 ; U2.3@28.28,5.47 C8.2 U3.1@28.28,9.13 ; U2.1 27.213,3.55 26.9,3.863 26.9,5.099 27.251,5.45 U2.3 ; U3.1 27.251,9.15 26.9,9.501 26.9,10.699 27.251,11.05 27.9,11.05 U3.3 28.28,11.07 C10.2 C10.2@28.35,12.67 ; C10.2@28.35,12.6 C10.2@28.35,12.67 ; Q1.S 28.35,13.985 ; C10.2@28.35,12.67 28.35,13.985
  L4 (SIG+PWR) w0.8: 2.5,15.8 2.5,17.2 3.775,18.475 8.625,18.475 9.3,17.8 13.5,17.8 ; 13.5,15.7 13.5,17.8 ; v1(23.4,13.9) 19.5,17.8 13.5,17.8
  other v1: 23.4,13.3 24,13.3 24.6,13.3 24,13.9 24.6,13.9 2.2,15.5 2.8,15.5 13.2,15.5 13.8,15.5 2.2,16 2.8,16 13.2,16 13.8,16
+A3V3: A3V3.1@20.2,1.5 C11.2 C12.2 C17.2 R20.1 U3.5 U4.5 U6.5 | length 60.4
  L1 (SIG) w0.4: v1(6.45,13.475) U4.5 7,12.5 7.52,13.02 C12.2 ; R20.1@12.554,20.635 12.578,20.635 13.013,20.2 v1(13.025,20.2) ; v1(17.45,13.475) U6.5 18,12.5 18.52,13.02 C17.2 ; A3V3.1@20.2,1.5 20.2,3.275 24.2,7.275 24.2,7.611 ; C11.2 24.37,9.15 U3.5
  L4 (SIG+PWR) w0.4: 2.475,20.075 2.6,20.2
  L4 (SIG+PWR) w0.8: 2.475,20.075 0.625,18.225 0.625,13.944 1.094,13.475 v1(6.45,13.475) v1(17.45,13.475) 20.55,13.475 24.2,9.825 24.2,8.125 ; 2.6,20.2 12.075,20.2 v1(13.025,20.2)
  other v1: 23.95,7.875 24.45,7.875 23.95,8.375 24.45,8.375
+VCONN: 5V.1@22.5,29 F1.1 P5.2 | length 2.6
  L1 (SIG) w0.15: P5.2@24.6,29 24.7,29.1 24.8,29 P5.2@25.025,29
  L1 (SIG) w0.4: 5V.1@22.5,29 P5.2@24.6,29
+VDDA: A3V3.1@9.825,19.375 C38.2 C39.2 R20.2 U11.20 U11.21 | length 7.1
  L1 (SIG) w0.2: C38.2 11.148,22.052 C38.2@11.159,22.052 ; R20.2@11.8,21.4 11.9,21.4 11.854,21.354 R20.2 ; C39.2@11.946,22.846 11.946,22.859 12.879,23.791 U11.21 12.879,23.821 12.536,24.164 U11.20
  L1 (SIG) w0.4: A3V3.1@9.825,19.375 9.868,19.375 R20.2 ; C38.2@11.148,22.052 R20.2@11.8,21.4 ; C38.2@11.159,22.052 C39.2
+VFUSE: 5V.1@23.9,15.3 D1.2 F1.2 Q1.D | length 2.8
  L1 (SIG) w0.4: 5V.1@23.9,15.3 23.9,15.469 24.6,16.169 24.6,17.858
+VM1: C3.2 C19.2 D5.C D6.K U7.1
+VM2: C1.2 C14.2 D3.C D4.K U5.1
+VMOT1: CSR2.1 D5.A U6.4 | length 3.2
  L1 (SIG) w0.15: CSR2.1 13.5,13.4 13.6,13.5 15.2,13.5 15.5,13.2 U6.4@15.5,12.798
+VMOT2: CSR1.1 D3.A U4.4 | length 3.2
  L1 (SIG) w0.15: CSR1.1 2.5,13.4 2.6,13.5 4.2,13.5 4.5,13.2 U4.4@4.5,12.798
BOOT0: R19.2 SW1.3 SW1.4 U11.45 | length 21
  L1 (SIG) w0.2: SW1.4 8.575,44.275 8.6,44.3 v1(8.6,42.5) ; v1(8.6,41.5) 8.6,40.1 8.7,40 8.575,39.875 SW1.3 8.6,39.725 R19.2 11.325,38.6 12.85,37.075 14.55,37.075 15,36.625 15,31.35 15.5,30.85 16.375,30.85 16.925,31.4 17,31.4 17.121,31.521 U11.45
  L4 (SIG+PWR) w0.2: v1(8.6,41.5) v1(8.6,42.5)
GND: C1.1 C2.1 C3.1 C4.1 C8.1 C9.1 C10.1 C11.1 C12.1 C13.1 C14.1 C17.1 C18.1 C19.1 C29.1 C31.2 C32.1 C33.1 C34.1 C35.1 C36.1 C37.1 C38.1 C39.1 C40.1 D1.1 D4.A D6.A P1.1 P2.1 P3.2 P5.1 Q1.G R15.1 R19.1 SW2.3 SW2.4 U2.2 U3.2 U4.2 U5.6 U5.13 U6.2 U7.6 U7.13 U9.3 U9.8 U10.3 U10.8 U11.19 U11.23 U11.35 U11.47 Y1.2 Y1.4 | length 50.4
  L1 (SIG) w0.15: C17.1 C17.1@19.2,14.7
  L1 (SIG) w0.2: P3.2@4.9,28.55 4.95,28.5 P3.2 ; C14.1 6.48,10.08 C14.1@6.6,10.2 ; v2(10,9) 10.725,9 11.25,8.475 U5.6 ; C39.1@11.245,23.573 C39.1@11.246,23.573 ; C39.1 C39.1@11.246,23.573 ; U11.19 12.182,24.518 12.2,24.5 12.173,24.5 C39.1@11.246,23.573 ; C35.1 12.646,22.159 13.512,23.025 13.55,23.025 13.586,23.061 U11.23 14.2,23.718 v1(14.2,24.1) ; D6.A@15.475,10.35 15.5,10.325 D6.A ; v1(15.7,31.625) 15.722,31.625 16.172,32.075 16.175,32.075 16.396,32.296 16.421,32.296 17,32.875 17.108,32.875 17.304,33.072 C34.1 C34.1@17.562,33.071 ; v1@18.041,33.55 v1(18.05,33.55) ; v1(18.9,26.975) 18.903,26.975 19.4,26.478 19.4,26.475 19.589,26.286 U11.35 20.486,25.396 C36.1 ; v2(21,9) 21.725,9 22.25,8.475 U7.6 ; C33.1@21.394,24.548 C33.1@21.486,24.548 ; C11.1 C11.1@24.2,10.9 ; P5.1@25,30 P5.1@25.025,30 ; C10.1@26.7,12.6 C10.1 ; D1.1@27.1,19.35 27.25,19.5 27.7,19.5 27.8,19.6 D1.1
  L1 (SIG) w0.4: C40.1 2.3,38.65 2.275,38.675 2.3,38.7 v1(2.3,39.3) ; SW2.3 3.475,39.85 3.525,39.9 3.475,39.95 v1(3.475,40.575) ; v1(3.475,43.425) 3.475,44.15 3.55,44.225 3.525,44.25 SW2.4 ; v1(3.875,28.5) 4.85,28.5 P3.2@4.9,28.55 ; U4.2 v1(5.5,16) ; v1(5.7,17.2) C13.1 ; v1(6,11) v1@6.01,10.99 ; C14.1@6.01,10.37 C14.1 ; U10.8 7.317,26 U10.3 7.482,26 v1(8,26) ; v1(6.975,38.625) 6.985,38.615 7.56,38.615 7.575,38.6 R19.1 ; v1(7.4,37.275) 7.405,37.27 7.405,36.345 Y1.2 ; v1(7.6,11.8) 7.6,11.175 C2.1@7.7,11.075 ; C1.1 v1(7.7,9.725) ; C12.1 v1(8.2,15.4) ; v1(8.525,34.7) 8.535,34.69 9.56,34.69 Y1.4 ; C32.1 v1(9.7,33.3) ; v1(9.3,21.6) 9.3,21.586 9.848,21.038 C38.1@9.848,20.928 ; v1(10.772,23.1) 10.782,23.1 11.245,23.562 C39.1@11.245,23.573 ; v1(11.1,34.3) 11.1,34.9 C31.2 ; C37.1 13.779,34.246 v1(14.25,33.775) ; P1.1 14.425,40 14.45,40.025 14.4,40.075 v1(14.4,41.1) ; U6.2 v1(16.5,16) ; v1(16.5,16.6) C18.1 ; C34.1@17.562,33.071 v1@18.041,33.55 ; v1(17.6,35.4) R15.1 ; v1(18.6,11.8) 18.6,11.175 C4.1@18.7,11.075 ; C3.1 v1(18.7,9.725) ; C17.1@19.2,14.7 v1(19.2,15.4) ; C36.1 C33.1@21.394,24.548 ; v1(21.2,36.6) 21.2,37.1 U9.3 ; U9.8 21.2,38.1 v1(21.2,38.7) ; C33.1@21.486,24.548 C33.1 21.563,24.548 22.136,23.975 v1(22.15,23.975) ; P2.1 23.7,40.2 v1(23.7,41.1) ; v1(23.725,30) P5.1@25,30 ; C9.1 v1(24.2,6.2) ; C11.1@24.2,10.9 v1(24.2,11.8) ; v1(24.5,36.6) 24.5,37.1 C29.1 ; P5.1@25.025,30 v1(26.2,30) ; v1(25.8,7) C8.1 ; v1(25.85,12.6) C10.1@26.7,12.6 ; Q1.G v1(27.4,15.3) ; U2.2 v1(29.2,4.5) ; U3.2 v1(29.2,10.1)
  other v1: 7.075,1.575 5.825,2.9 18.325,6.8 19.6,6.8 15.5,10.975 17,10.975 17.6,10.975 4.5,11 6.6,11 27.2,18.9 27.8,18.9 28.4,18.9 18.325,20.725 14.6,21.475 19.05,21.75 21.9,22.575
  other v2: 9.25,9 10.75,9 20.25,9 21.75,9
MOT1_A1: P4.1 U7.2 | length 20.3
  L1 (SIG) w0.2: P4.1@5.8,5.375 P4.1 ; v1(18.975,6.8) 18.975,7.175 19.225,7.425 20.133,7.425 20.25,7.542 U7.2
  L1 (SIG) w0.25: v1(5.825,3.55) P4.1@5.825,5.4
  L4 (SIG+PWR) w0.25: v1(5.825,3.55) 18.4,3.55 18.975,4.125 v1(18.975,6.8)
MOT1_A2: P4.2 U7.3 | length 21.6
  L1 (SIG) w0.2: v1(20.225,6.8) 20.293,6.8 20.601,7.109 20.609,7.109 20.75,7.25 U7.3
  L1 (SIG) w0.25: v1(7.075,2.225) P4.2
  L4 (SIG+PWR) w0.25: v1(7.075,2.225) 18.8,2.225 20.225,3.65 v1(20.225,6.8)
MOT1_AIN1: U7.10 U11.30 | length 15.8
  L1 (SIG) w0.2: U11.30 18.75,23.596 18.75,22.8 20.75,20.8 U7.10
MOT1_AIN2: U7.9 U11.31 | length 16.2
  L1 (SIG) w0.2: U11.31 19.225,23.829 19.225,23.025 21.25,21 U7.9
MOT1_B1: P4.7 U7.4 | length 11.4
  L1 (SIG) w0.25: P4.7 13.325,6.525 14.025,7.225 16.05,7.225 17.275,6 20.425,6 21.25,6.825 U7.4@21.25,7.9 ; U7.4@21.25,7.925 U7.4
MOT1_B2: P4.8 U7.5 | length 11.1
  L1 (SIG) w0.25: P4.8 14.575,6.55 14.725,6.7 15.575,6.7 16.975,5.3 20.625,5.3 21.75,6.425 21.75,8.025 U7.5
MOT1_BIN1: U7.8 U11.32 | length 16.6
  L1 (SIG) w0.2: U11.32 19.7,24.061 19.7,23.3 21.75,21.25 U7.8
MOT1_BIN2: U7.7 U11.33 | length 17
  L1 (SIG) w0.2: U11.33 18.921,25.579 19,25.5 19,25.468 20.202,24.266 20.202,23.498 22.25,21.45 U7.7
MOT1_C_SENSE: C18.2 R7.2 U11.17 | length 15.1
  L1 (SIG) w0.2: U11.17 12.264,26.025 13.25,26.025 14.85,24.425 14.85,22.925 14.6,22.675 v1(14.6,22.125) ; C18.2 17.4,18.2 R7.2 18.275,18.2 18.6,18.525 18.6,19.45 17.85,20.2 v1(17.825,20.2)
  L4 (SIG+PWR) w0.2: v1(14.6,22.125) 15.9,22.125 v1(17.825,20.2)
MOT1_MODE: U7.11 U11.34 | length 18
  L1 (SIG) w0.2: U11.34 19.243,25.929 19.825,25.346 19.825,25.181 20.675,24.331 20.675,23.825 v1(21.4,23.1) ; v1(19.575,21.25) 19.575,21.2 19.625,21.15 19.643,21.168 19.657,21.168 20.25,20.575 U7.11
  L4 (SIG+PWR) w0.2: v1(19.575,21.25) 19.575,21.262 21.338,23.025 21.35,23.025 21.4,23.075 v1(21.4,23.1)
MOT2_A1: P4.3 U5.2 | length 3
  L1 (SIG) w0.25: P4.3@8.325,5.4 8.333,5.408 8.333,6.383 9.25,7.3 U5.2
MOT2_A2: P4.4 U5.3 | length 2.7
  L1 (SIG) w0.25: P4.4 9.575,6.85 9.75,7.025 U5.3
MOT2_AIN1: U5.10 U11.25 | length 16.7
  L1 (SIG) w0.2: U5.10 9.75,16.475 11.9,18.625 13.3,18.625 16.625,21.95 16.625,22.175 16.061,22.739 U11.25
MOT2_AIN2: U5.9 U11.26 | length 17.1
  L1 (SIG) w0.2: U5.9 10.25,16.3 12.05,18.1 13.5,18.1 17.1,21.7 17.1,22.418 U11.26
MOT2_B1: P4.5 U5.4 | length 2.9
  L1 (SIG) w0.25: U5.4@10.25,7.975 10.25,7.05 10.85,6.45 10.85,5.425 P4.5 ; U5.4@10.25,8.025 U5.4
MOT2_B2: P4.6 U5.5 | length 3.4
  L1 (SIG) w0.25: U5.5@10.75,7.925 10.75,7.225 11.175,6.8 11.725,6.8 12.075,6.45 P4.6
MOT2_BIN1: U5.8 U11.27 | length 17.5
  L1 (SIG) w0.2: U5.8 10.75,16.075 12.275,17.6 13.65,17.6 17.575,21.525 17.575,22.65 U11.27
MOT2_BIN2: U5.7 U11.28 | length 17.9
  L1 (SIG) w0.2: U5.7 11.25,15.825 12.5,17.075 13.875,17.075 18.075,21.275 18.075,22.857 U11.28
MOT2_C_SENSE: C13.2 R6.2 U11.18 | length 9.8
  L1 (SIG) w0.15: C13.2 R6.2
  L1 (SIG) w0.2: R6.2 7.5,21.2 10.6,24.3 11.246,24.3 U11.18
MOT2_MODE: U5.11 U11.29 | length 20
  L1 (SIG) w0.2: U5.11 9.25,16.7 11.675,19.125 13.05,19.125 15.281,21.356 15.281,23.731 16.35,24.8 16.839,24.8 U11.29
NRST: C40.2 P2.5 R18.1 SW2.1 SW2.2 U9.1 U9.10 U11.7 | length 49.4
  L1 (SIG) w0.2: SW2.2 1.325,42.725 2.05,42 1.325,41.275 SW2.1 1.3,39.725 C40.2 1.3,37.9 1.55,37.65 3.8,37.65 ; 2,42 16.6,42 17.375,41.225 17.375,39.05 19.892,36.533 20.058,36.533 20.2,36.675 20.2,37.175 U9.1 U9.10@20.2,37.9 ; R18.1 3.8,37.65 ; U11.7 11.803,30.528 11.775,30.5 11.775,30.571 10.996,31.35 6.975,31.35 5.725,32.6 5.725,37.075 5.15,37.65 3.8,37.65 ; P2.5 19.7,39 20.2,38.5 20.2,38.1 U9.10
OSC: C32.2 R17.1 Y1.3 | length 2.8
  L1 (SIG) w0.2: Y1.3 7.4,34.65 7.4,33.417 7.517,33.3 C32.2 8,32.5 R17.1@8,32.4
OSC_IN: C31.1 U11.5 Y1.1 | length 7.8
  L1 (SIG) w0.2: Y1.1 9.748,36.182 10.418,36.182 10.567,36.033 11.067,36.033 C31.1 C31.1@11.2,36 ; C31.1@11.2,36 11.683,36 11.891,35.792 11.891,34.091 11.4,33.6 11.4,32.361 U11.5
OSC_OUT: R17.2 U11.6 | length 3.8
  L1 (SIG) w0.2: R17.2 10.729,32.325 U11.6
OUT1: R7.1 U6.1 | length 2.1
  L1 (SIG) w0.2: U6.1 17.45,16.65 17.5,16.7 R7.1
OUT2: R6.1 U4.1 | length 2.9
  L1 (SIG) w0.2: U4.1 6.45,16.25 6.7,16.5 7.3,16.5 7.517,16.717 7.517,17.183 R6.1
S_LED: LED1.A U11.44 | length 1.4
  L1 (SIG) w0.2: U11.44 18.427,32.188 LED1.A
S_LED1: LED1.C R15.2 | length 1.2
  L1 (SIG) w0.2: R15.2 19.573,33.427 LED1.C
SPI1_MISO: R16.2 U11.14 | length 1.4
  L1 (SIG) w0.2: R16.2 9.546,25.454 9.5,25.5 9.609,25.5 10.395,26.286 U11.14
  L1 (SIG) w0.4: R16.2@9.454,25.454 R16.2@9.5,25.5
SPI1_MISO2: P3.5 R16.1 U10.2 U10.9 | length 4
  L1 (SIG) w0.2: P3.5@5,25.525 5.025,25.5 U10.9@6.575,25.5 ; U10.9@6.725,25.5 7.25,25.5 U10.2 8.1,25.5 8.846,24.754 R16.1
SPI1_MOSI: P3.6 U10.1 U10.10 U11.15 | length 8
  L1 (SIG) w0.2: P3.6 5.2,24.7 5.9,24.7 6.2,25 U10.10 7.375,25 U10.1 7.612,25 7.883,25 8,24.883 8,24.3 8.5,23.8 9.1,23.8 10.275,24.975 10.275,25.375 10.757,25.857 U11.15
SPI1_NSS: P3.3 R14.2 U10.5 U10.6 U11.12 | length 9
  L1 (SIG) w0.2: P3.3@5.023,27.475 5.197,27.3 5.9,27.3 6.2,27 6.353,27 U10.6 U10.6@6.575,27 ; U10.6@6.775,27 7.25,27 U10.5 7.612,27 8.2,27 8.4,27.2 8.4,28.1 8.2,28.3 R14.2 7.5,28.9 8,29.4 9.411,29.4 U11.12
SPI1_SCK: P3.4 U10.4 U10.7 U11.13 | length 5
  L1 (SIG) w0.2: P3.4@5.075,26.525 5.1,26.5 U10.7@6.575,26.5 ; U10.7@6.725,26.5 7.275,26.5 U10.4 9.503,26.5 9.67,26.333 9.744,26.333 U11.13
SWCLK: P2.4 U9.2 U9.9 U11.38 | length 12.8
  L1 (SIG) w0.2: U11.38 22.575,32.093 22.575,34.175 20.7,36.05 U9.2 U9.9@20.7,37.9 ; U9.9 20.7,38.218 P2.4
SWDIO: P2.3 U9.4 U9.7 U11.37 | length 13
  L1 (SIG) w0.2: U11.37 23.125,31.936 23.125,34.4 21.7,35.825 U9.4 U9.7@21.7,37.9 ; U9.7 21.7,38.1 P2.3
UART_RX: P1.3 U11.41 | length 16.4
  L1 (SIG) w0.2: P1.3 12.4,39.9 12.3,39.8 12.4,39.7 12.4,38.7 13.3,37.8 16.9,37.8 20.8,33.9 20.8,32.439 U11.41
UART_TX: P1.2 U11.40 | length 16.4
  L1 (SIG) w0.2: P1.2 13.4,38.9 13.9,38.4 17.125,38.4 21.35,34.175 21.35,32.282 19,29.932 19,29.9 18.921,29.821 U11.40
VS: P2.2 R11.2 U9.5 U9.6 | length 4
  L1 (SIG) w0.2: U9.6@22.2,37.8 U9.5 R11.2 ; U9.6 22.2,38.1 22.2,38.5 22.7,39 P2.2
pads on no net: P1.P-MOUNT1 P1.P-MOUNT2 P2.P-MOUNT1 P2.P-MOUNT2 P3.1 P3.P-MOUNT1 P3.P-MOUNT2 P4.9 P4.10 P5.P-MOUNT1 P5.P-MOUNT2 U2.4 U3.4 U11.2 U11.3 U11.4 U11.8 U11.9 U11.10 U11.11 U11.16 U11.22 U11.39 U11.42 U11.43 U11.46

## Polygon pours and split planes (outlines as drawn)
+5V on L1 (SIG) "NONET_L-01_P-001" (solid, pour order 24): 23.3,14.3 23,14 23,13.2 23.3,12.9 24.7,12.9 25,13.2 25,14 24.7,14.3
+3V3 on L1 (SIG) "NONET_L-01_P-001" (solid, pour order 23): 23.4,3.275 23.3,3.175 22.6,3.175 22.4,3.375 22.4,4.075 22.6,4.275 23.3,4.275 23.4,4.175 24.1,4.175 24.1,3.275
+A3V3 on L1 (SIG) "NONET_L-01_P-001" (solid, pour order 20): 24.637,8.588 24.737,8.488 24.737,7.788 24.537,7.588 23.837,7.588 23.637,7.788 23.637,8.488 23.737,8.588 23.737,9.288 24.637,9.288
+VCONN on L1 (SIG) "NONET_L-01_P-001" (solid, pour order 11): 25.5,27.4 25.5,26.4 25.5,25.05 24.4,25.05 24.4,29 25.5,29
+VFUSE on L1 (SIG) "NONET_L-01_P-001" (solid, pour order 12): 27,25.6 28.6,25.6 28.6,23.3 27.4,22.1 24.1,22.1 24.1,22.9 26.6,22.9 27,23.3
+VFUSE on L1 (SIG) "NONET_L-01_P-001" (solid, pour order 13): 24.4,21.8 24.1,22.1 24.1,22.2 25.7,22.2 25.7,22.1 25.4,21.8 25.4,18.5 25.8,18.1 27.8,18.1 27.8,17.3 25,17.3 24.5,16.8 24.4,16.9 24.3,16.9 24.4,17 24.4,17.4
GND on L1 (SIG) "NONET_L-01_P-001" (solid, pour order 14): 26.9,19.3 26.9,18.8 27.1,18.6 28.5,18.6 28.7,18.8 28.7,19.3
+VM2 on L1 (SIG) "NONET_L-01_P-001" (solid, pour order 10): 3.9,8.3 4,8.4 5.1,8.4 5.5,8.8 6.9,8.8 6.9,8.7 7.2,8.4 8,8.4 8.1,8.3 8.9,8.3 8.9,7.8 2.1,7.8 2.1,8.6 3.1,8.6 3.4,8.3
+5V on L1 (SIG) "NONET_L-01_P-001" (solid, pour order 9): 12.8,14.5 12.8,16.2 13,16.4 14,16.4 14.2,16.2 14.2,14.5
+5V on L1 (SIG) "NONET_L-01_P-001" (solid, pour order 8): 1.8,14.5 1.8,16.2 2,16.4 3,16.4 3.2,16.2 3.2,14.5
+VMOT1 on L1 (SIG) "NONET_L-01_P-001" (solid, pour order 7): 12.8,13.2 14.2,13.2 14.2,12.1 14,11.9 14,10.9 13,10.9 13,11.9 12.8,12.1
GND on L1 (SIG) "NONET_L-01_P-001" (solid, pour order 6): 15.9,10.1 15.9,11.1 15.7,11.3 15.3,11.3 15.1,11.1 15.1,10.1
GND on L1 (SIG) "NONET_L-01_P-001" (solid, pour order 5): 18,9.6 18,11.1 17.8,11.3 16.8,11.3 16.6,11.1 16.6,9.6
GND on L1 (SIG) "NONET_L-01_P-001" (solid, pour order 4): 4.9,10.1 4.9,11.1 4.7,11.3 4.3,11.3 4.1,11.1 4.1,10.1
GND on L1 (SIG) "NONET_L-01_P-001" (solid, pour order 3): 7,9.6 7,11.1 6.8,11.3 5.8,11.3 5.6,11.1 5.6,9.6
+VMOT2 on L1 (SIG) "NONET_L-01_P-001" (solid, pour order 2): 1.8,13.2 3.2,13.2 3.2,12.1 3,11.9 3,10.9 2,10.9 2,11.9 1.8,12.1
+VM1 on L1 (SIG) "NONET_L-01_P-001" (solid, pour order 0): 14.9,8.3 15,8.4 16.1,8.4 16.5,8.8 17.9,8.8 17.9,8.7 18.2,8.4 19,8.4 19.1,8.3 19.9,8.3 19.9,7.8 13.1,7.8 13.1,8.6 14.1,8.6 14.4,8.3
+3V3 on L4 (SIG+PWR) "NONET_L-01_P-001" (solid, pour order 27): 0,0 0,45 30,45 30,0
+A3V3 on L4 (SIG+PWR) "NONET_L-01_P-001" (solid, pour order 19): 24.575,8.675 24.75,8.5 24.75,7.775 24.563,7.588 23.837,7.588 23.637,7.788 23.637,8.488 23.837,8.688 23.837,9.288 24.575,9.288
+5V on L4 (SIG+PWR) "NONET_L-01_P-001" (solid, pour order 17): 23.3,14.3 23,14 23,13.2 23.3,12.9 24.7,12.9 25,13.2 25,14 24.7,14.3
+3V3 on L4 (SIG+PWR) "NONET_L-01_P-001" (solid, pour order 15): 23.4,3.275 23.3,3.175 22.6,3.175 22.4,3.375 22.4,4.075 22.6,4.275 23.3,4.275 23.4,4.175 24.1,4.175 24.1,3.275
+5V on L4 (SIG+PWR) "NONET_L-01_P-001" (solid, pour order 22): 14,16.4 13,16.4 12.8,16.2 12.8,15.3 13,15.1 14,15.1 14.2,15.3 14.2,16.2
+5V on L4 (SIG+PWR) "NONET_L-01_P-001" (solid, pour order 21): 3,16.4 2,16.4 1.8,16.2 1.8,15.3 2,15.1 3,15.1 3.2,15.3 3.2,16.2
GND on L2 (GND) "NONET_L-01_P-001" (solid, pour order 25): 0,0 30,0 30,45 0,45
GND on L3 (GND) "NONET_L-01_P-001" (solid, pour order 26): 0,0 30,0 30,45 0,45

## Silkscreen, mask and mechanical layers (free items; w line width, h text height)
Top Overlay:
  drawing of 14 lines, arcs and shapes, not listed
  text "NRST" at 5.3,39.7 h0.75 r90
  text "BOOT" at 10.4,39.7 h0.75 r90
  text "UART" at 17.1,39.6 h0.75 r90
  text "SWD" at 26.4,39.5 h0.75 r90
  text "U7=ZOOM" at 28,39 h0.75 r90
  text "U5=FOCUS" at 29.2,38.3 h0.75 r90
  text "PWR" at 25.5,26.3 h0.75
  text "SPI" at 2.9,21.8 h0.75
  text "UQ BIO" at 1.3,17 h0.75 r90
  text "ROBOT" at 2.6,17 h0.75 r90
  text "STEPPER" at 15.4,5.1 h0.75
Bottom Overlay:
  text "UQ Biorobot" at 20.082,40.5 h1
  text "Motorized Lens Driver" at 24.997,39 h1
  text "Rev 1.0" at 18.166,37.5 h1
  text "P3" at 10.833,33.6 h1
  text "P1" at 15.666,33.6 h1
  text "P2" at 20.833,33.6 h1
  text "1" at 7.1,31.65 h0.9
  text "NC" at 10.75,31.65 h0.9
  text "GND" at 16.2,31.65 h0.9
  text "GND" at 21.2,31.65 h0.9
  text "GND" at 11.2,30.15 h0.9
  text "TX" at 15.75,30.15 h0.9
  text "VCC" at 21.2,30.15 h0.9
  text "CSN" at 11.2,28.65 h0.9
  text "RX" at 15.75,28.65 h0.9
  text "SWDIO" at 22.024,28.65 h0.9
  text "SCK" at 11.2,27.15 h0.9
  text "SWCLK" at 22.099,27.15 h0.9
  text "RST" at 21.2,25.65 h0.9
  text "MISO" at 12.353,25.396 h0.9
  text "6" at 7.25,24.15 h0.9
  text "MOSI" at 11.5,24.15 h0.9
  text "P4" at 10.783,21.4 h1
  text "MOT1 = FOCUS" at 25.248,21.4 h1
  text "MOT2 = ZOOM" at 25.331,19.9 h1
  text "1" at 7.1,19.65 h0.9
  text "FA+" at 11.15,19.65 h0.9
  text "FA-" at 11.15,18.15 h0.9
  text "DESOLDER R11" at 25.082,17.4 h1
  text "ZA+" at 11.15,16.65 h0.9
  text "IF USING" at 23.165,15.9 h1
  text "ZA-" at 11.15,15.15 h0.9
  text "STLINK V2" at 23.749,14.4 h1
  text "ZB+" at 12.278,13.396 h0.9
  text "ZB-" at 11.15,12.15 h0.9
  text "MAX NOMINAL:" at 24.998,11.9 h1
  text "FB-" at 11.15,10.65 h0.9
  text "5V @ 500mA" at 24.332,10.4 h1
  text "8" at 7.25,9.15 h0.9
  text "FB+" at 11.15,9.15 h0.9